# Altium PCB MainBoardPCB_PWR.PcbDoc (part 3 of 29)
Units mm, origin at the board's own origin, x right, y up, seen from the top; angles counter-clockwise.
Board outline 333.63 x 349.38 mm, 16 copper layers (L1, L2 (GND), L3 (Sign), L4 (GND), L5 (Sign), L6 (PWR/GND), L7(PWR/GND), L8 (PWR/GND), L9 (PWR/GND), L10 (PWR/GND), L11 (PWR/GND), L12 (Sign), L13 (GND), L14 (Sign), L15 (GND), L16), stack 2.503 mm thick; 2187 components, 1615 nets, 7987 pads, 1695 vias.
Unrouted connection lines stored in the file: 4757.
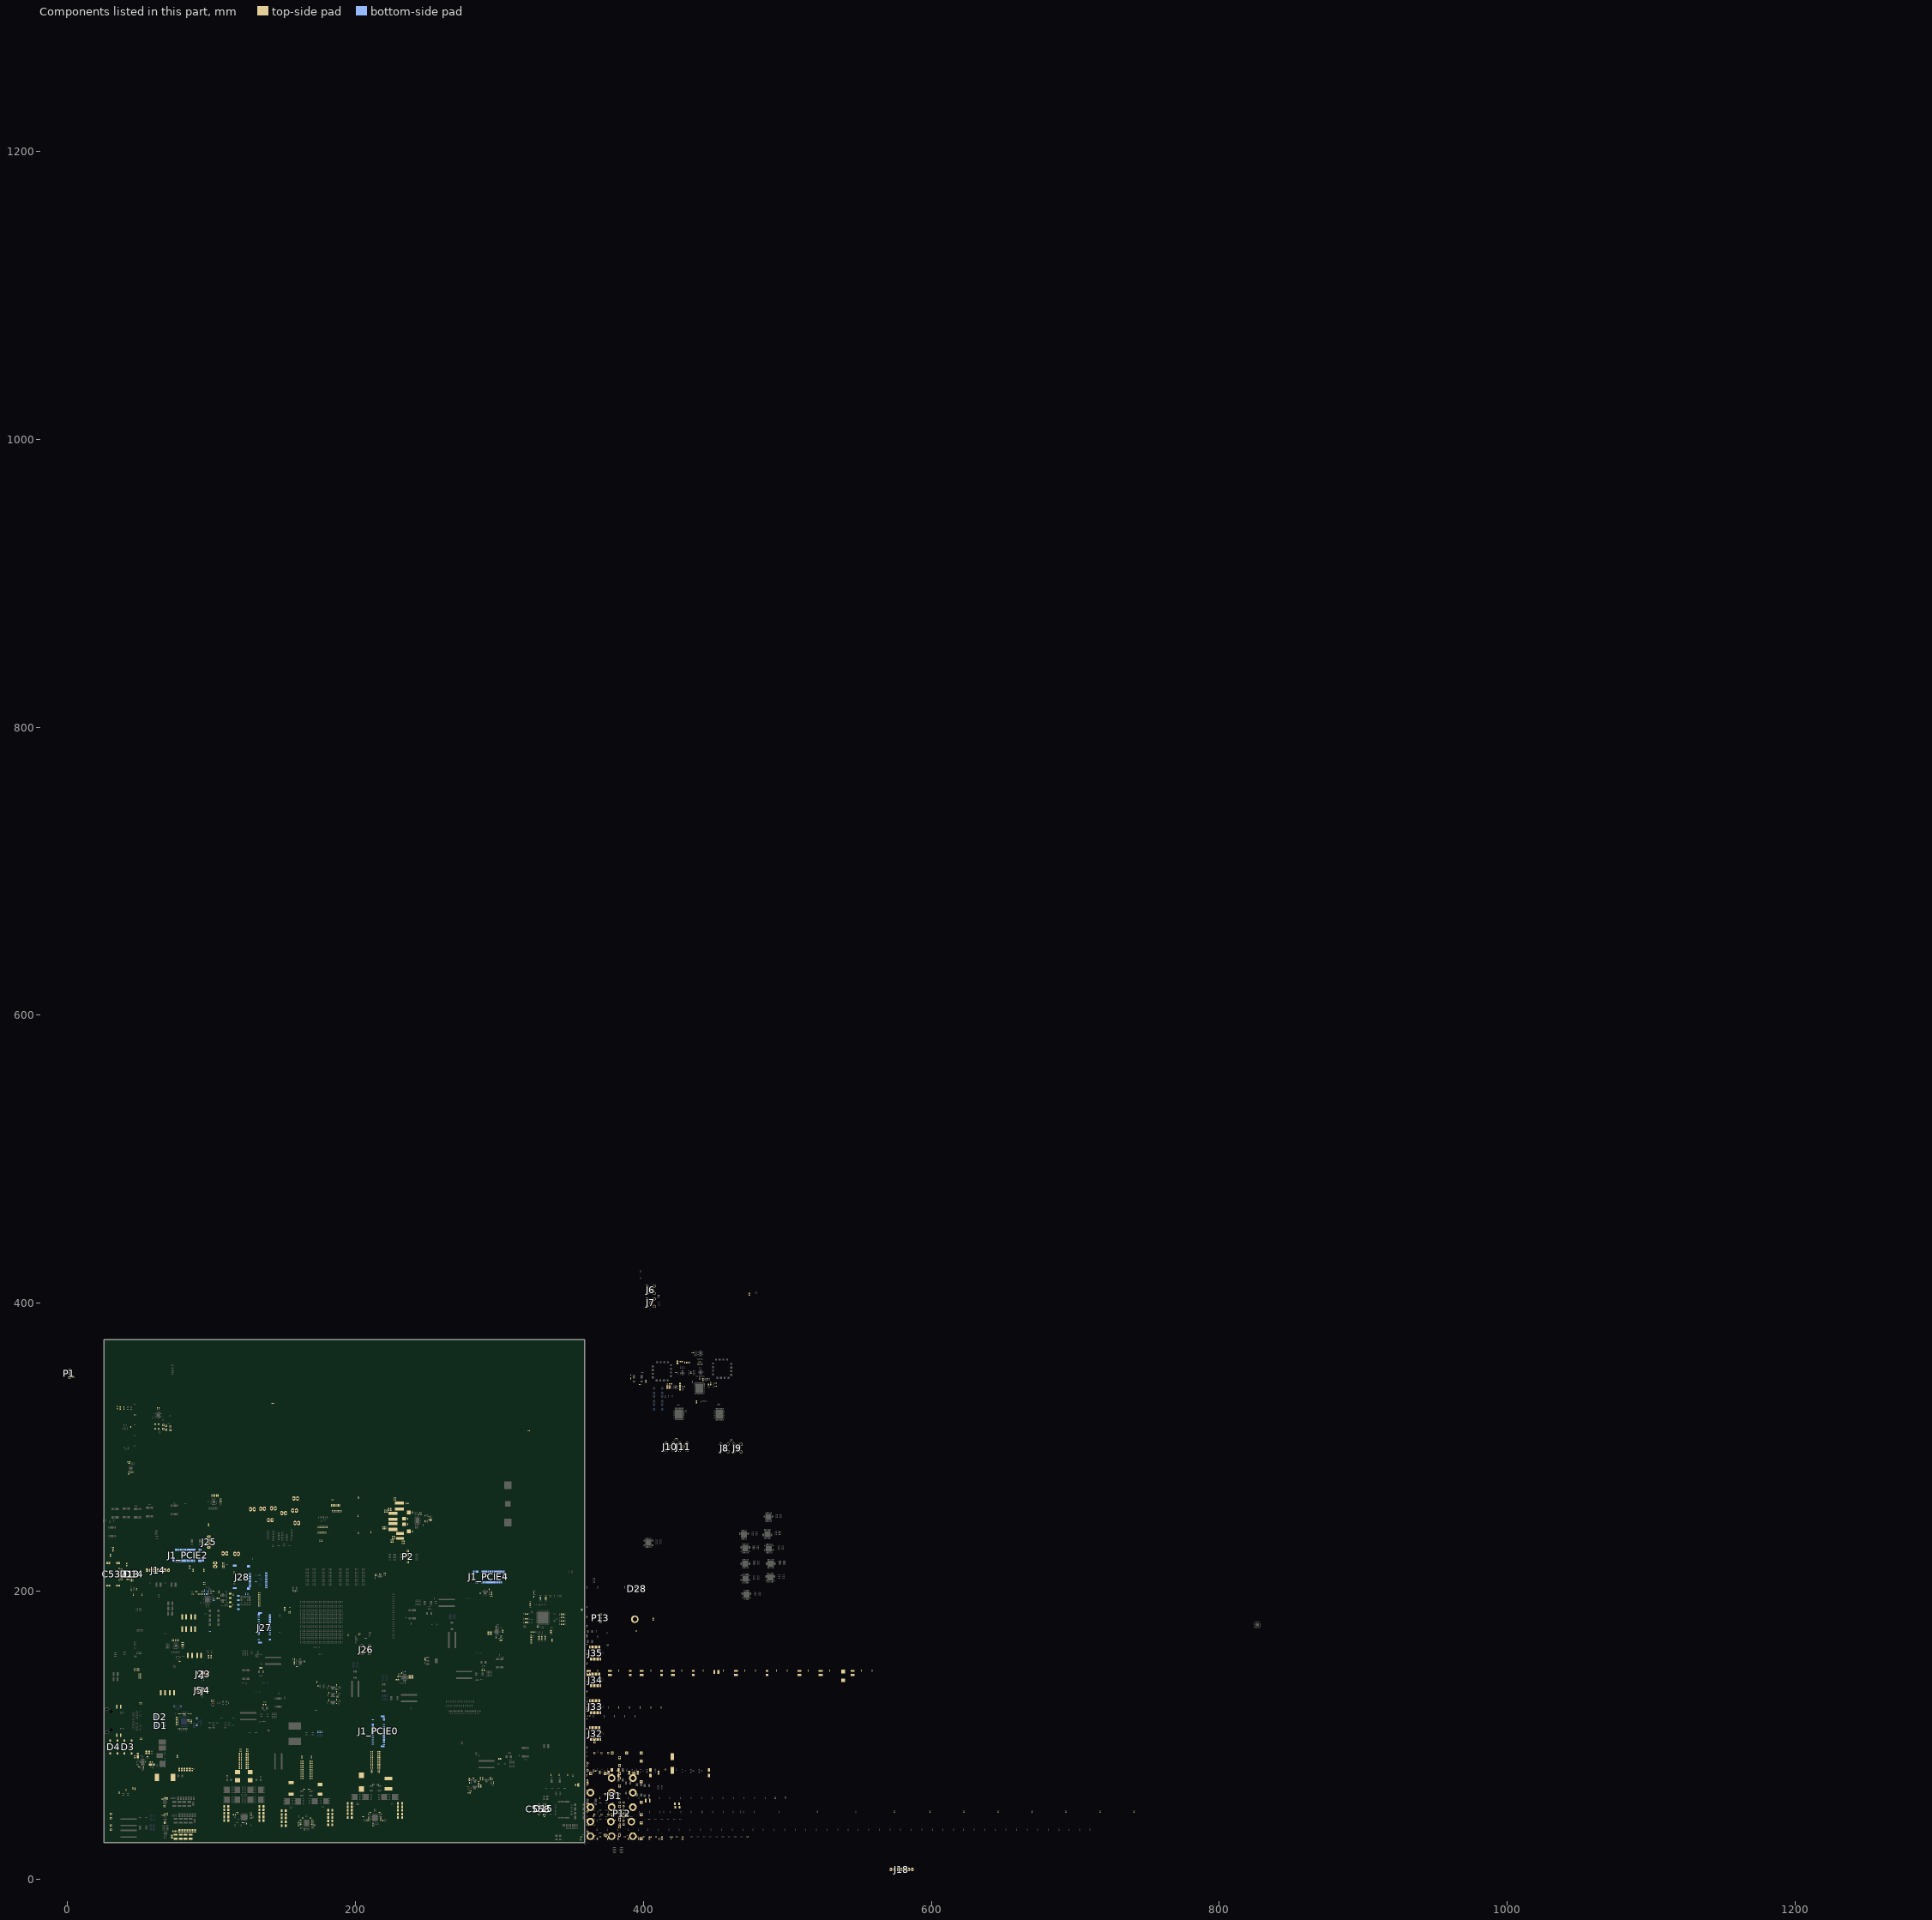
[diagram p10: the components of this part, seen from the top]

## Components (designator, comment, footprint, x,y, rotation, side; value= is the part's Value field where it differs from the comment) (continued)
C309_U_Pomiar_pradu_napiecia_2 "100nF" "CAP 0402/1005 RF" 360.832,130.327 r90 top (schematic designator C309)
C309_U_Pomiar_pradu_napiecia_3 "100nF" "CAP 0402/1005 RF" 360.832,136.804 r90 top (schematic designator C309)
C309_U_Pomiar_pradu_napiecia_4 "100nF" "CAP 0402/1005 RF" 360.832,143.281 r90 top (schematic designator C309)
C309_U_Pomiar_pradu_napiecia_5 "100nF" "CAP 0402/1005 RF" 360.832,149.758 r90 top (schematic designator C309)
C309_U_Pomiar_pradu_napiecia_6 "100nF" "CAP 0402/1005 RF" 360.832,156.235 r90 top (schematic designator C309)
C309_U_Pomiar_pradu_napiecia_7 "100nF" "CAP 0402/1005 RF" 360.832,162.712 r90 top (schematic designator C309)
C309_U_Pomiar_pradu_napiecia_8 "100nF" "CAP 0402/1005 RF" 360.832,169.189 r90 top (schematic designator C309)
C309_U_Pomiar_pradu_napiecia_9 "100nF" "CAP 0402/1005 RF" 360.832,175.666 r90 top (schematic designator C309)
C309_U_Pomiar_pradu_napiecia_10 "100nF" "CAP 0402/1005 RF" 360.832,182.143 r90 top (schematic designator C309)
C309_U_Pomiar_pradu_napiecia_11 "100nF" "CAP 0402/1005 RF" 360.832,188.62 r90 top (schematic designator C309)
C310 "100nF" "CAP 0402/1005 RF" 360.832,40.386 r90 top
C311_I2C_Expander1 "1uF" "CAP 0402/1005 RF" 360.832,52.603 r90 top (schematic designator C311)
C311_I2C_Expander2 "1uF" "CAP 0402/1005 RF" 360.832,59.08 r90 top (schematic designator C311)
C311_I2C_Expander3 "1uF" "CAP 0402/1005 RF" 360.832,65.557 r90 top (schematic designator C311)
C311_I2C_Expander? "1uF" "CAP 0402/1005 RF" 360.832,72.034 r90 top (schematic designator C311)
C311_I2C_Expander_10 "1uF" "CAP 0402/1005 RF" 360.832,78.511 r90 top (schematic designator C311)
C311_I2C_Expander_11 "1uF" "CAP 0402/1005 RF" 360.832,84.988 r90 top (schematic designator C311)
C311_I2C_Expander_12 "1uF" "CAP 0402/1005 RF" 360.832,91.465 r90 top (schematic designator C311)
C311_I2C_Expander_13 "1uF" "CAP 0402/1005 RF" 360.832,97.942 r90 top (schematic designator C311)
C311_I2C_Expander_14 "1uF" "CAP 0402/1005 RF" 360.832,104.419 r90 top (schematic designator C311)
C311_I2C_Expander_15 "1uF" "CAP 0402/1005 RF" 360.832,110.896 r90 top (schematic designator C311)
C311_I2C_Expander_16 "1uF" "CAP 0402/1005 RF" 360.832,117.373 r90 top (schematic designator C311)
C320 "10nF" "CAP 0402/1005 RF" 397.535,343.662 r180 top
C321 "3.3nF" "CAP 0603/1608 RF" 401.726,345.77 r90 top
C322 "27pF" "CAP 0402/1005 RF" 391.185,347.749 r90 top
C323 "27pF" "CAP 0402/1005 RF" 391.185,349.729 r270 top
C324 "10uF" "CAP 0805/2012 RF" 354.8,65.363 r90 top
C325 "100nF" "CAP 0402/1005 RF" 439.853,359.673 r270 top
C326 "1uF" "CAP 0402/1005 RF" 335.672,72.451 r90 top
C327 "1uF" "CAP 0402/1005 RF" 341.514,72.451 r90 top
C328 "1uF" "CAP 0402/1005 RF" 347.356,72.451 r90 top
C329 "1uF" "CAP 0402/1005 RF" 350.97,71.756 r90 top
C330 "100nF" "CAP 0402/1005 RF" 438.652,359.673 r270 top
C331 "1uF" "CAP 0402/1005 RF" 202.311,170.148 r270 top
C332 "1uF" "CAP 0402/1005 RF" 207.098,167.219 r0 top
C333 "10nF" "CAP 0201/0603 RF" 422.687,351.917 r180 top
C334 "100nF" "CAP 0402/1005 RF" 450.24,344.378 r180 top
C335 "100nF" "CAP 0402/1005 RF" 450.24,342.288 r180 top
C336 "100nF" "CAP 0402/1005 RF" 429.836,358.766 r90 top
C337 "100nF" "CAP 0402/1005 RF" 430.894,358.766 r90 top
C338 "100nF" "CAP 0402/1005 RF" 431.952,358.766 r90 top
C339 "10uF" "CAP 0805/2012 RF" 423.697,358.837 r90 top
C340 "1uF" "CAP 0402/1005 RF" 428.777,358.766 r90 top
C341 "100nF" "CAP 0402/1005 RF" 434.229,365.633 r0 top
C342 "100nF" "CAP 0402/1005 RF" 433.222,351.253 r0 top
C343 "100nF" "CAP 0402/1005 RF" 433.222,352.253 r0 top
C344 "10nF" "CAP 0201/0603 RF" 422.687,350.832 r180 top
C345 "22pF" "CAP 0402/1005 RF" 118.036,44.404 r0 top
C346 "100nF" "CAP 0402/1005 RF" 118.036,46.421 r180 top
C347 "10uF" "CAP 1206/3216" 110.249,48.133 r180 top
C348 "10uF" "CAP 1206/3216" 110.249,50.597 r180 top
C349 "22pF" "CAP 0402/1005 RF" 127.419,44.139 r180 top
C350 "100nF" "CAP 0402/1005 RF" 127.404,46.156 r0 top
C351 "1uF" "CAP 0402/1005 RF" 121.352,38.84 r90 top
C352 "10uF" "CAP 1206/3216" 134.685,48.088 r0 top
C353 "10uF" "CAP 1206/3216" 134.685,50.597 r0 top
C354 "4.7 µF" "CAP 0603/1608 RF" 220.396,243.898 r270 top
C355 "4.7 µF" "CAP 0603/1608 RF" 219.102,243.909 r270 top
C356 "1uF" "CAP 0402/1005 RF" 124.277,38.625 r90 top
C357 "100nF" "CAP 0402/1005 RF" 127.419,42.524 r180 top
C358 "1uF" "CAP 0603/1608 RF" 115.967,44.623 r0 top
C359 "100nF" "CAP 0402/1005 RF" 124.878,90.408 r0 top
C360 "470nF" "CAP 0402/1005 RF" 120.127,90.408 r180 top
C361 "1uF" "CAP 0402/1005 RF" 124.879,88.519 r0 top
C362 "4.7uF" "CAP 0603/1608 RF" 120.127,79.465 r180 top
C363 "10uF" "CAP 0603/1608 RF" 120.127,78.146 r180 top
C364 "22uF" "CAP 0603/1608 RF" 120.127,80.785 r180 top
C365 "10uF" "CAP 0603/1608 RF" 124.879,76.826 r0 top
C366 "22uF" "CAP 0603/1608 RF" 120.127,76.826 r180 top
C367 "10uF" "CAP 0603/1608 RF" 124.879,79.465 r0 top
C368 "22uF" "CAP 0603/1608 RF" 124.879,78.146 r0 top
C369 "10uF" "CAP 0603/1608 RF" 124.879,80.785 r0 top
C370 "22uF" "CAP 0603/1608 RF" 120.127,82.104 r180 top
C371 "10uF" "CAP 1206/3216 - 0.8MM" 134.685,43.216 r0 top
C372 "10uF" "CAP 1206/3216 - 0.8MM" 110.249,45.669 r180 top
C373 "10uF" "CAP 1206/3216 - 0.8MM" 110.249,40.767 r180 top
C374 "10uF" "CAP 1206/3216 - 0.8MM" 134.685,45.669 r0 top
C375 "10uF" "CAP 1206/3216 - 0.8MM" 110.249,43.216 r180 top
C376 "10uF" "CAP 1206/3216 - 0.8MM" 134.685,40.706 r0 top
C377 "100nF" "CAP 0402/1005 RF" 124.878,89.449 r0 top
C378 "470nF" "CAP 0402/1005 RF" 120.128,88.519 r180 top
C379 "1uF" "CAP 0402/1005 RF" 120.127,89.449 r180 top
C380 "4.7uF" "CAP 0603/1608 RF" 120.127,83.424 r180 top
C381 "10uF" "CAP 0603/1608 RF" 124.879,83.424 r0 top
C382 "22uF" "CAP 0603/1608 RF" 124.879,84.743 r0 top
C383 "10uF" "CAP 0603/1608 RF" 120.127,87.382 r180 top
C384 "22uF" "CAP 0603/1608 RF" 124.879,86.063 r0 top
C385 "10uF" "CAP 0603/1608 RF" 124.879,82.104 r0 top
C386 "22uF" "CAP 0603/1608 RF" 120.127,84.743 r180 top
C387 "10uF" "CAP 0603/1608 RF" 124.878,87.382 r0 top
C388 "22uF" "CAP 0603/1608 RF" 120.127,86.063 r180 top
C389 "22pF" "CAP 0402/1005 RF" 208.951,44.8 r270 top
C390 "100nF" "CAP 0402/1005 RF" 210.306,46.316 r180 top
C391 "10uF" "CAP 1206/3216" 196.063,50.291 r180 top
C392 "10uF" "CAP 1206/3216" 196.063,52.731 r0 top
C393 "22pF" "CAP 0402/1005 RF" 218.055,44.799 r270 top
C394 "100nF" "CAP 0402/1005 RF" 216.655,46.316 r0 top
C395 "1uF" "CAP 0402/1005 RF" 212.42,36.998 r0 top
C396 "10uF" "CAP 1206/3216" 231.006,50.198 r180 top
C397 "10uF" "CAP 1206/3216" 231.006,52.687 r0 top
C398 "1uF" "CAP 0402/1005 RF" 212.295,38.616 r90 top
C399 "100nF" "CAP 0402/1005 RF" 205.386,43.462 r180 top
C400 "10uF" "CAP 1206/3216 - 0.8MM" 231.007,42.723 r180 top
C401 "10uF" "CAP 1206/3216 - 0.8MM" 231.007,45.203 r180 top
C402 "10uF" "CAP 1206/3216 - 0.8MM" 231.007,47.72 r180 top
C403 "10uF" "CAP 1206/3216 - 0.8MM" 196.032,42.803 r0 top
C404 "10uF" "CAP 1206/3216 - 0.8MM" 196.063,45.323 r0 top
C405 "10uF" "CAP 1206/3216 - 0.8MM" 196.063,47.846 r0 top
C406 "100nF" "CAP 0402/1005 RF" 211.318,73.946 r180 top
C407 "470nF" "CAP 0402/1005 RF" 211.321,74.92 r180 top
C408 "1uF" "CAP 0402/1005 RF" 211.318,75.891 r180 top
C409 "4.7uF" "CAP 0603/1608 RF" 211.321,79.974 r180 top
C410 "10uF" "CAP 0603/1608 RF" 211.321,81.397 r180 top
C411 "22uF" "CAP 0603/1608 RF" 211.321,77.155 r180 top
C412 "10uF" "CAP 0603/1608 RF" 211.321,78.552 r180 top
C413 "22uF" "CAP 0603/1608 RF" 211.321,82.794 r180 top
C414 "10uF" "CAP 0603/1608 RF" 211.321,87.036 r180 top
C415 "22uF" "CAP 0603/1608 RF" 211.321,88.458 r180 top
C416 "10uF" "CAP 0603/1608 RF" 211.321,84.191 r180 top
C417 "22uF" "CAP 0603/1608 RF" 211.318,85.626 r180 top
C418 "100nF" "CAP 0402/1005 RF" 216.235,73.946 r0 top
C419 "470nF" "CAP 0402/1005 RF" 216.235,74.92 r0 top
C420 "1uF" "CAP 0402/1005 RF" 216.235,75.891 r0 top
C421 "4.7uF" "CAP 0603/1608 RF" 216.236,79.974 r0 top
C422 "10uF" "CAP 0603/1608 RF" 216.236,81.397 r0 top
C423 "22uF" "CAP 0603/1608 RF" 216.235,77.155 r0 top
C424 "10uF" "CAP 0603/1608 RF" 216.236,78.552 r0 top
C425 "22uF" "CAP 0603/1608 RF" 216.236,82.794 r0 top
C426 "10uF" "CAP 0603/1608 RF" 216.237,87.036 r0 top
C427 "22uF" "CAP 0603/1608 RF" 216.227,88.453 r0 top
C428 "10uF" "CAP 0603/1608 RF" 216.236,84.191 r0 top
C429 "22uF" "CAP 0603/1608 RF" 216.236,85.626 r0 top
C430 "22pF" "CAP 0402/1005 RF" 161.858,41.04 r0 top
C431 "100nF" "CAP 0402/1005 RF" 163.383,42.453 r90 top
C432 "10uF" "CAP 1206/3216" 150.151,44.958 r180 top
C433 "10uF" "CAP 1206/3216" 150.151,47.523 r0 top
C434 "22pF" "CAP 0402/1005 RF" 170.124,40.64 r180 top
C435 "100nF" "CAP 0402/1005 RF" 168.633,42.468 r90 top
C436 "1uF" "CAP 0402/1005 RF" 160.318,39.203 r270 top
C437 "10uF" "CAP 1206/3216" 182.534,45.266 r180 top
C438 "10uF" "CAP 1206/3216" 182.534,47.806 r0 top
C439 "1uF" "CAP 0402/1005 RF" 164.433,34.527 r90 top
C440 "100nF" "CAP 0402/1005 RF" 160.538,43.517 r90 top
C441 "10uF" "CAP 1206/3216 - 0.8MM" 182.534,37.765 r180 top
C442 "10uF" "CAP 1206/3216 - 0.8MM" 182.524,40.248 r180 top
C443 "10uF" "CAP 1206/3216 - 0.8MM" 182.534,42.726 r180 top
C444 "10uF" "CAP 1206/3216 - 0.8MM" 150.151,37.187 r0 top
C445 "10uF" "CAP 1206/3216 - 0.8MM" 150.151,39.767 r0 top
C446 "10uF" "CAP 1206/3216 - 0.8MM" 150.151,42.367 r0 top
C447 "100nF" "CAP 0402/1005 RF" 162.815,85.322 r180 top
C448 "470nF" "CAP 0402/1005 RF" 162.815,84.205 r180 top
C449 "1uF" "CAP 0402/1005 RF" 162.815,83.112 r180 top
C450 "4.7uF" "CAP 0603/1608 RF" 162.815,81.817 r180 top
C451 "10uF" "CAP 0603/1608 RF" 162.815,80.318 r180 top
C452 "22uF" "CAP 0603/1608 RF" 162.816,78.845 r180 top
C453 "10uF" "CAP 0603/1608 RF" 162.816,77.372 r180 top
C454 "22uF" "CAP 0603/1608 RF" 162.816,75.899 r180 top
C455 "10uF" "CAP 0603/1608 RF" 162.816,74.426 r180 top
C456 "22uF" "CAP 0603/1608 RF" 162.816,72.952 r180 top
C457 "10uF" "CAP 0603/1608 RF" 162.816,71.479 r180 top
C458 "22uF" "CAP 0603/1608 RF" 162.816,70.006 r180 top
C459 "100nF" "CAP 0402/1005 RF" 169.283,85.322 r0 top
C460 "470nF" "CAP 0402/1005 RF" 169.282,84.204 r0 top
C461 "1uF" "CAP 0402/1005 RF" 169.282,83.112 r0 top
C462 "4.7uF" "CAP 0603/1608 RF" 169.282,81.817 r0 top
C463 "10uF" "CAP 0603/1608 RF" 169.282,80.318 r0 top
C464 "22uF" "CAP 0603/1608 RF" 169.266,78.845 r0 top
C465 "10uF" "CAP 0603/1608 RF" 169.282,77.372 r0 top
C466 "22uF" "CAP 0603/1608 RF" 169.282,75.899 r0 top
C467 "10uF" "CAP 0603/1608 RF" 169.281,74.425 r0 top
C468 "22uF" "CAP 0603/1608 RF" 169.281,72.952 r0 top
C469 "10uF" "CAP 0603/1608 RF" 169.281,71.479 r0 top
C470 "22uF" "CAP 0603/1608 RF" 169.281,70.006 r0 top
C471 "100nF" "CAP 0402/1005 RF" 51.689,97.4 r90 top
C472 "100nF" "CAP 0402/1005 RF" 50.546,97.409 r90 top
C473 "100nF" "CAP 0402/1005 RF" 50.292,122.183 r270 top
C474 "100nF" "CAP 0402/1005 RF" 51.308,122.183 r270 top
C475 "Capacitor_1210" CAPC3326X17L 35.636,99.915 r180 top
C476 "Capacitor_1210" CAPC3326X17L 35.636,119.761 r180 top
C479 "100nF" "CAP 0402/1005 RF" 89.798,107.315 r180 bottom
C480 "27pF" "CAP 0402/1005 RF" 78.809,120.113 r270 bottom
C481 "27pF" "CAP 0402/1005 RF" 74.11,120.113 r90 bottom
C482 "100nF" "CAP 0402/1005 RF" 89.798,106.365 r180 bottom
C483 "100nF" "CAP 0402/1005 RF" 89.798,112.141 r180 bottom
C484 "100nF" "CAP 0402/1005 RF" 89.798,111.141 r180 bottom
C485 "1uF" "CAP 0402/1005 RF" 78.914,104.752 r90 top
C486 "1uF" "CAP 0402/1005 RF" 78.911,114.466 r270 top
C487 "100nF" "CAP 0402/1005 RF" 77.937,114.466 r270 top
C488 "100nF" "CAP 0402/1005 RF" 76.966,114.466 r270 top
C489 "10uF" "CAP 0402/1005 RF" 77.937,104.752 r90 top
C490 "10nF" "CAP 0402/1005 RF" 76.99,104.752 r90 top
C491 "1uF" "CAP 0402/1005 RF" 83.828,109.639 r0 top
C492 "1uF" "CAP 0402/1005 RF" 83.837,110.561 r0 top
C493 "1uF" "CAP 0402/1005 RF" 173.197,136.909 r90 top
C494 "100nF" "CAP 0402/1005 RF" 81.837,114.46 r270 top
C495 "100nF" "CAP 0402/1005 RF" 79.902,114.466 r270 top
C496 "100nF" "CAP 0402/1005 RF" 80.87,114.46 r270 top
C497 "10uF" "CAP 0402/1005 RF" 83.038,104.752 r90 top
C498 "10nF" "CAP 0402/1005 RF" 82.107,104.752 r90 top
C499 "1uF" "CAP 0402/1005 RF" 75.941,111.541 r0 top
C500 "1uF" "CAP 0402/1005 RF" 75.932,106.045 r0 top
C501 "100nF" "CAP 0402/1005 RF" 75.932,106.965 r0 top
C502 "100nF" "CAP 0402/1005 RF" 75.932,110.639 r0 top
C503 "10uF" "CAP 0402/1005 RF" 75.941,112.443 r0 top
C504 "10nF" "CAP 0402/1005 RF" 75.932,107.893 r0 top
C505 "1uF" "CAP 0402/1005 RF" 80.217,104.752 r90 top
C506 "1uF" "CAP 0402/1005 RF" 75.932,108.809 r0 top
C507 "1uF" "CAP 0402/1005 RF" 85.001,114.466 r270 top
C508 "1uF" "CAP 0402/1005 RF" 85.761,108.639 r180 top
C509 "100nF" "CAP 0402/1005 RF" 85.741,109.542 r180 top
C510 "100nF" "CAP 0402/1005 RF" 83.992,114.466 r270 top
C511 "100nF" "CAP 0402/1005 RF" 75.932,109.724 r0 top
C512 "100nF" "CAP 0402/1005 RF" 86.011,114.466 r270 top
C513 "10uF" "CAP 0402/1005 RF" 81.14,104.752 r90 top
C514 "10nF" "CAP 0402/1005 RF" 85.741,110.444 r180 top
C515 "4.7uF" "CAP 0603/1608 RF" 104.604,195.232 r0 top
C516 "4.7uF" "CAP 0603/1608 RF" 105.054,199.396 r270 top
C517 "100nF" "CAP 0402/1005 RF" 115.249,197.535 r90 top
C518 "2.2uF" "CAP 1206/3216 - 0.8MM" 118.72,195.199 r90 bottom
C519 "100nF" "CAP 0402/1005 RF" 114.989,190.479 r270 top
C520 "2.2uF" "CAP 1206/3216 - 0.8MM" 118.72,188.994 r90 bottom
C521 "100nF" "CAP 0402/1005 RF" 125.318,198.013 r270 bottom
C522 "1uF" "CAP 0402/1005 RF" 123.76,198.013 r270 bottom
C523 "4.7uF" "CAP 0603/1608 RF" 87.249,214.503 r90 top
C524 "4.7uF" "CAP 0603/1608 RF" 94.742,214.503 r90 top
C525 "10nF" "CAP 0402/1005 RF" 150.885,188.731 r180 top
C526 "10nF" "CAP 0402/1005 RF" 150.885,187.72 r180 top
C527 "10nF" "CAP 0402/1005 RF" 154.323,184.707 r180 top
C528 "10nF" "CAP 0402/1005 RF" 154.323,185.801 r180 top
C529 "10nF" "CAP 0402/1005 RF" 154.305,188.341 r270 top
C530 "10nF" "CAP 0402/1005 RF" 150.885,186.577 r180 top
C531 "100nF" "CAP 0402/1005 RF" 46.736,322.453 r180 top
C532 "100nF" "CAP 0402/1005 RF" 63.5,327.076 r90 top
C533 "100nF" "CAP 0402/1005 RF" 62.4,327.076 r90 top
C534 "100nF" "CAP 0402/1005 RF" 44,314.013 r270 top
C535 "22pF" "CAP 0402/1005 RF" 157.014,200.432 r180 top
C536 "22pF" "CAP 0402/1005 RF" 158.734,200.432 r0 top
C537 "WE-Communication Connectors 692121130100" 692121130100 35.121,203.883 r270 top
C538 "1uF" "CAP 0402/1005 RF" 45.547,207.532 r90 top
C539 "4.7uF" "CAP 0603/1608 RF" 44.348,207.532 r90 top
C540 "100nF" "CAP 0402/1005 RF" 31.669,230.378 r0 top
C541 "100nF" "CAP 0402/1005 RF" 31.796,229.489 r0 top
C542 "100nF" "CAP 0402/1005 RF" 31.796,228.6 r0 top
C543 "100nF" "CAP 0402/1005 RF" 31.796,227.711 r0 top
C544 "1uF" "CAP 0402/1005 RF" 133.341,211.033 r180 bottom
C545 "100nF" "CAP 0402/1005 RF" 357.251,187.579 r0 top
C546 "100nF" "CAP 0402/1005 RF" 357.251,186.69 r0 top
C547 "100nF" "CAP 0402/1005 RF" 130.946,206.629 r0 bottom
C548 "11pF" "CAP 0402/1005 RF" 161.859,38.015 r0 top
C549 "220pF" "CAP 0402/1005 RF" 160.268,37.4 r270 top
C550 "4.7uF" "CAP 0402/1005 RF" 181.639,133.844 r270 top
C551 "10uF" "CAP 0402/1005 RF" 186.791,134.644 r270 top
C552 "4.7uF" "CAP 0402/1005 RF" 181.639,129.204 r270 top
C553 "10uF" "CAP 0402/1005 RF" 186.869,129.833 r270 top
C554 "4.7uF" "CAP 0402/1005 RF" 181.639,124.215 r270 top
C555 "10uF" "CAP 0402/1005 RF" 186.854,124.45 r270 top
C558 "WR-Communication Connectors 614105150721" 614105150721 327.441,48.431 r90 bottom
C559 "1uF" "CAP 0402/1005 RF" 331.387,43.48 r0 top
C560 "4.7uF" "CAP 0603/1608 RF" 331.26,44.75 r0 top
C561 "100nF" "CAP 0402/1005 RF" 77.861,151.16 r0 top
C562 "100nF" "CAP 0402/1005 RF" 395.088,172.212 r0 top
C563_5V_to_3V3_for_FTDI "4.7uF" "CAP 0603/1608 RF" 42.745,282.16 r90 top (schematic designator C563)
C563_U_5V_to_3V31 "4.7uF" "CAP 0603/1608 RF" 406.908,180.457 r90 top (schematic designator C563)
C563_U_5V_to_3V32 "4.7uF" "CAP 0603/1608 RF" 287.029,64.684 r270 top (schematic designator C563)
C563_U_5V_to_3V33 "4.7uF" "CAP 0603/1608 RF" 286.906,69.606 r270 top (schematic designator C563)
C564_5V_to_3V3_for_FTDI "4.7uF" "CAP 0603/1608 RF" 44.82,282.785 r180 top (schematic designator C564)
C564_U_5V_to_3V31 "4.7uF" "CAP 0603/1608 RF" 285.672,67.109 r90 top (schematic designator C564)
C564_U_5V_to_3V32 "4.7uF" "CAP 0603/1608 RF" 285.654,64.684 r270 top (schematic designator C564)
C564_U_5V_to_3V33 "4.7uF" "CAP 0603/1608 RF" 288.308,69.606 r270 top (schematic designator C564)
C565_5V_to_3V3_for_FTDI "4.7uF" "CAP 0603/1608 RF" 42.52,289.909 r0 top (schematic designator C565)
C565_U_5V_to_3V31 "4.7uF" "CAP 0603/1608 RF" 279.018,69.134 r90 top (schematic designator C565)
C565_U_5V_to_3V32 "4.7uF" "CAP 0603/1608 RF" 278.954,59.976 r180 top (schematic designator C565)
C565_U_5V_to_3V33 "4.7uF" "CAP 0603/1608 RF" 293.804,69.606 r270 top (schematic designator C565)
C566_5V_to_3V3_for_FTDI "100nF" "CAP 0402/1005 RF" 42.745,287.706 r0 top (schematic designator C566)
C566_U_5V_to_3V31 "100nF" "CAP 0402/1005 RF" 279.242,66.899 r270 top (schematic designator C566)
C566_U_5V_to_3V32 "100nF" "CAP 0402/1005 RF" 280.366,61.582 r90 top (schematic designator C566)
C566_U_5V_to_3V33 "100nF" "CAP 0402/1005 RF" 295.76,67.053 r90 top (schematic designator C566)
C567_5V_to_3V3_for_FTDI "2.2uF" "CAP 0402/1005 RF" 42.772,288.686 r0 top (schematic designator C567)
C567_U_5V_to_3V31 "2.2uF" "CAP 0402/1005 RF" 281.861,70.159 r180 top (schematic designator C567)
C567_U_5V_to_3V32 "2.2uF" "CAP 0402/1005 RF" 279.451,61.582 r90 top (schematic designator C567)
C567_U_5V_to_3V33 "2.2uF" "CAP 0402/1005 RF" 294.937,69.521 r270 top (schematic designator C567)
C568 "4.7uF" "CAP 0402/1005 RF" 292.935,201.182 r270 top
C569 "4.7uF" "CAP 0402/1005 RF" 294.485,196.36 r0 top
C570 "4.7uF" "CAP 0402/1005 RF" 286.714,198.556 r90 top
C571 "1nF" "CAP 0201/0603 RF" 290.33,196.303 r180 top
C572 "10uF" "CAP 0603/1608 RF" 229.012,138.456 r0 top
C573 "10nF" "CAP 0201/0603 RF" 231.66,136.949 r180 top
C574 "10uF" "CAP 0805/2012 RF" 237.691,140.38 r270 top
C575 "10uF" "CAP 0805/2012 RF" 239.494,140.38 r270 top
C576 "10uF" "CAP 0603/1608 RF" 230.305,140.553 r0 top
C577 "10nF" "CAP 0201/0603 RF" 232.192,143.112 r270 top
C578 "100nF" "CAP 0402/1005 RF" 234.68,143.658 r270 top
C579 "100nF" "CAP 0402/1005 RF" 234.692,136.374 r90 top
C580 "4.7uF" "CAP 0805/2012 RF" 425.358,343.392 r270 top
C581 "10uF" "CAP 0805/2012 RF" 416.436,341.692 r90 top
C582 "4.7uF" "CAP 0805/2012 RF" 418.189,341.692 r90 top
C583 "100nF" "CAP 0402/1005 RF" 416.436,343.829 r0 top
C584 "4.7uF" "CAP 0805/2012 RF" 425.358,340.592 r90 top
C585 "100nF" "CAP 0402/1005 RF" 111.695,122.453 r90 top
C586 "2.2uF" "CAP 1206/3216 - 0.8MM" 113.084,196.76 r90 top
C587 "2.2uF" "CAP 1206/3216 - 0.8MM" 113.084,190.759 r270 top
C588 "100nF" "CAP 0402/1005 RF" 323.853,198.975 r270 top
C589 "100nF" "CAP 0402/1005 RF" 323.853,196.112 r270 top
C590 "100nF" "CAP 0402/1005 RF" 322.084,169.216 r0 top
C591 "10uF" "CAP 0402/1005 RF" 322.084,165.152 r0 top
C592 "100nF" "CAP 0402/1005 RF" 322.084,164.067 r0 top
C593 "100nF" "CAP 0402/1005 RF" 326.139,175.429 r90 top
C594 "100nF" "CAP 0402/1005 RF" 327.063,175.429 r90 top
C595 "10uF" "CAP 0805/2012 RF" 56.704,88.017 r270 top
C596 "10uF" "CAP 0805/2012 RF" 54.875,88.007 r270 top
C597 "1uF" "CAP 0402/1005 RF" 55.54,84.951 r180 top
C598 "10uF" "CAP 0603/1608 RF" 58.228,81.386 r180 top
C603 "43pF" "CAP 0201/0603 RF" 250.98,249.474 r270 top
C604 "1µF" "CAP 0402/1005 RF" 245.124,254.516 r180 top
C605 "100pF" "CAP 0201/0603 RF" 250.972,251.571 r90 top
C606 "4.7 µF" "CAP 0603/1608 RF" 220.471,255.655 r270 top
C607 "4.7 µF" "CAP 0603/1608 RF" 224.596,256.791 r270 top
C609 "FC0H224ZFTBR24" FC0H224ZFTBR24 420.04,80.314 r90 top
C610 "4.7 µF" "CAP 0603/1608 RF" 223.201,256.791 r270 top
C611 "4.7 µF" "CAP 0603/1608 RF" 221.799,255.655 r270 top
C612 "43pF" "CAP 0201/0603 RF" 248.17,252.624 r90 top
C613 "4.7 µF" "CAP 0603/1608 RF" 227.389,264.63 r0 top
C614 "4.7 µF" "CAP 0603/1608 RF" 235.772,260.761 r180 top
C615 "4.7 µF" "CAP 0603/1608 RF" 227.389,263.314 r0 top
C616 "100pF" "CAP 0201/0603 RF" 248.32,248.558 r270 top
C617 "4.7 µF" "CAP 0603/1608 RF" 225.383,235.476 r0 top
C618 "4.7 µF" "CAP 0603/1608 RF" 233.121,233.286 r180 top
C619 "4.7 µF" "CAP 0603/1608 RF" 225.875,237.479 r270 top
C620 "4.7 µF" "CAP 0603/1608 RF" 233.121,234.614 r180 top
C621 "4.7 µF" "CAP 0603/1608 RF" 227.265,237.479 r270 top
C622 "4.7 µF" "CAP 0603/1608 RF" 225.396,234.202 r0 top
C623 "100nF" "CAP 0402/1005 RF" 387.198,43.485 r0 top
C624 "10nF" "CAP 0201/0603 RF" 360.934,43.637 r0 top
C625 "10nF" "CAP 0201/0603 RF" 365.252,43.637 r0 top
C626 "10nF" "CAP 0201/0603 RF" 369.57,43.637 r0 top
C627 "100nF" "CAP 0201/0603 RF" 360.68,158.648 r90 top
C628 "470nF" "CAP 0402/1005 RF" 368.198,158.318 r90 top
C629 "100nF" "CAP 0201/0603 RF" 381.241,75.298 r0 top
C630 "470nF" "CAP 0402/1005 RF" 385.889,75.146 r0 top
C631 "10uF" "CAP 0603/1608 RF" 365.9,74.968 r0 top
C632 "470nF" "CAP 0402/1005 RF" 361.251,75.146 r0 top
C633 "3nF" "CAP 0402/1005 RF" 110.833,71.526 r270 top
C634 "330pF" "CAP 0402/1005 RF" 122.002,39.112 r0 bottom
C635 "6.8nF" "CAP 0402/1005 RF" 122.002,38.147 r0 bottom
C636 "3nF" "CAP 0402/1005 RF" 134.085,71.416 r270 top
C637 "1.2nF" "CAP 0402/1005 RF" 212.33,65.623 r180 top
C638 "1.2nF" "CAP 0402/1005 RF" 215.56,65.623 r0 top
C639 "47nF" "CAP 0402/1005 RF" 209.441,42.359 r0 top
C640 "47nF" "CAP 0402/1005 RF" 217.555,42.359 r180 top
C641 "470pF" "CAP 0402/1005 RF" 217.555,41.359 r180 top
C642 "56pF" "CAP 0402/1005 RF" 209.451,41.359 r0 top
C643 "8.2nF" "CAP 0402/1005 RF" 219.162,40.694 r270 top
C644 "820pF" "CAP 0402/1005 RF" 207.935,40.749 r270 top
C645 "1.2nF" "CAP 0402/1005 RF" 164.256,62.307 r180 top
C646 "1.2nF" "CAP 0402/1005 RF" 167.741,62.307 r0 top
C647 "47nF" "CAP 0402/1005 RF" 161.843,39.015 r0 top
C648 "47nF" "CAP 0402/1005 RF" 170.124,38.803 r180 top
C649 "100nF" "CAP 0402/1005 RF" 410.883,27.889 r90 top
C650 "180pF" "CAP 0402/1005 RF" 170.124,37.89 r180 top
C651 "100nF" "CAP 0402/1005 RF" 404.025,27.889 r90 top
C652 "2.2nF" "CAP 0402/1005 RF" 171.666,37.4 r270 top
C653 "100nF" "CAP 0402/1005 RF" 396.659,27.889 r90 top
C654 "100nF" "CAP 0402/1005 RF" 173.978,134.224 r90 top
C655 "5.6nF" "CAP 0402/1005 RF" 186.721,131.98 r270 top
C656 "5.6nF" "CAP 0402/1005 RF" 187.116,126.745 r270 top
C657 "5.6nF" "CAP 0402/1005 RF" 186.869,121.628 r270 top
C658 "100nF" "CAP 0402/1005 RF" 472.338,29.388 r0 top
C659 "4.7uF" "CAP 0603/1608 RF" 419.24,29.21 r0 top
C660 "100nF" "CAP 0402/1005 RF" 423.227,29.388 r0 top
C661 "4.7uF" "CAP 0603/1608 RF" 404.762,29.21 r0 top
C662 "100nF" "CAP 0402/1005 RF" 408.749,29.388 r0 top
C663 "27pF" "CAP 0402/1005 RF" 395.796,29.388 r0 top
C664 "27pF" "CAP 0402/1005 RF" 400.113,29.388 r0 top
C665 "100nF" "CAP 0402/1005 RF" 365.57,29.388 r0 top
C666 "100nF" "CAP 0402/1005 RF" 369.887,29.388 r0 top
C667 "100nF" "CAP 0402/1005 RF" 374.205,29.388 r0 top
C668 "100nF" "CAP 0402/1005 RF" 378.524,29.388 r0 top
C669 "100nF" "CAP 0402/1005 RF" 382.841,29.388 r0 top
C670 "100nF" "CAP 0402/1005 RF" 387.159,29.388 r0 top
C671 "100nF" "CAP 0402/1005 RF" 391.477,29.388 r0 top
C672 "Capacitor_1210" CAPC3326X17L 403.019,54.508 r0 top
C673 "100nF" "CAP 0402/1005 RF" 356.734,29.437 r0 top
C674 "4.7uF" "CAP 0402/1005 RF" 159.306,147.662 r180 top
C675 "4.7uF" "CAP 0402/1005 RF" 157.587,152.512 r270 top
C676 "4.7uF" "CAP 0402/1005 RF" 164.589,151.15 r270 top
C677 "100nF" "CAP 0402/1005 RF" 389.293,27.889 r90 top
C678 "100uF" "CAP 1206/3216" 423.621,49.86 r0 top
C679 "100uF" "CAP 1206/3216" 423.342,52.4 r0 top
C680 "1uF" "CAP 0402/1005 RF" 361.251,41.491 r0 top
C693 "470nF" "CAP 0402/1005 RF" 59.589,77.52 r90 top
C694 "4.7uF" "CAP 0603/1608 RF" 86.59,76.065 r270 top
C695 "10uF" "CAP 0805/2012 RF" 79.463,76.068 r270 top
C696 "10uF" "CAP 0805/2012 RF" 83.04,76.069 r270 top
C697 "10uF" "CAP 0805/2012 RF" 81.218,76.069 r270 top
C698 "10uF" "CAP 0805/2012 RF" 77.658,76.065 r270 top
C699 "10uF" "CAP 0805/2012 RF" 84.868,76.065 r270 top
C700 "1uF" "CAP 0402/1005 RF" 87.728,76.065 r270 top
C701 "12nF" "CAP 0402/1005 RF" 49.574,77.884 r180 top
C702 "36pF" "CAP 0402/1005 RF" 48.659,79.42 r0 top
C703 "15nF" "CAP 0402/1005 RF" 52.778,77.442 r90 top
C704 "1uF" "CAP 0603/1608 RF" 46.685,85.014 r90 top
C705 "10uF" "CAP 0603/1608 RF" 302.427,172.155 r90 top
C706 "10nF" "CAP 0201/0603 RF" 301.053,175.397 r0 top
C707 "10uF" "CAP 0805/2012 RF" 292.356,170.733 r90 top
C708 "10uF" "CAP 0805/2012 RF" 294.076,170.733 r90 top
C709 "10uF" "CAP 0603/1608 RF" 301.102,165.803 r180 top
C710 "10nF" "CAP 0201/0603 RF" 301.053,168.063 r180 top
C711 "100nF" "CAP 0402/1005 RF" 297.752,167.803 r90 top
C712 "100nF" "CAP 0402/1005 RF" 297.752,175.18 r270 top
C713 "100nF" "CAP 0402/1005 RF" 248.384,150.119 r270 top
C714 "330nF" "CAP 0603/1608 RF" 248.376,152.782 r90 top
C715 "100nF" "CAP 0402/1005 RF" 382.168,27.889 r90 top
C716 "100nF" "CAP 0402/1005 RF" 375.056,27.889 r90 top
C717 "100nF" "CAP 0402/1005 RF" 367.944,27.889 r90 top
C718 "100nF" "CAP 0402/1005 RF" 356.464,27.352 r90 top
C719 "1nF" "CAP 0201/0603 RF" 161.718,153.027 r180 top
C720 "1uF" "CAP 0402/1005 RF" 213.741,211.107 r270 top
C721 "1uF" "CAP 0402/1005 RF" 214.655,211.107 r270 top
C722 "1uF" "CAP 0402/1005 RF" 217.151,212.008 r0 top
C723 "1uF" "CAP 0402/1005 RF" 220.364,212.558 r180 top
C724 "10nF" "CAP 0201/0603 RF" 388.645,29.997 r90 top
C725 "10nF" "CAP 0201/0603 RF" 381.279,29.997 r90 top
C726 "10nF" "CAP 0201/0603 RF" 373.913,29.997 r90 top
C727 "10nF" "CAP 0201/0603 RF" 366.547,29.997 r90 top
C728 "100nF" "CAP 0402/1005 RF" 101.516,194.212 r180 bottom
C729 "100nF" "CAP 0402/1005 RF" 96.278,197.904 r270 bottom
C730 "100nF" "CAP 0402/1005 RF" 97.278,197.904 r270 bottom
C731 "2.2uF" "CAP 0402/1005 RF" 101.516,193.329 r180 bottom
C732 "100nF" "CAP 0402/1005 RF" 95.154,197.904 r270 bottom
C733 "1uF" "CAP 0402/1005 RF" 48.234,201.394 r270 top
C734 "1uF" "CAP 0402/1005 RF" 44.348,200.729 r90 top
C735 "100nF" "CAP 0402/1005 RF" 95.053,200.491 r270 bottom
C736 "9pF" "CAP 0201/0603 RF" 96.124,198.327 r0 top
C737 "9pF" "CAP 0201/0603 RF" 101.401,199.944 r180 top
C738 "6TPE680MI" "CAP POL 2917/7343" 538.734,141.097 r90 top
C739 "100uF" "CAP 1210/3225 - 1MM" 545.236,143.231 r90 top
C740 "4.7uF" "CAP 0402/1005 RF" 551.434,144.729 r90 top
C741 "4.7uF" "CAP 0402/1005 RF" 558.8,144.729 r90 top
C742 "100uF" "CAP 1210/3225 - 1MM" 523.113,143.231 r90 top
C743 "4.7uF" "CAP 0402/1005 RF" 529.311,144.729 r90 top
C744 "47uF" "CAP 1206/3216 - 0.8MM" 485.775,143.231 r90 top
C745 "4.7uF" "CAP 0402/1005 RF" 492.455,144.729 r90 top
C746 "4.7uF" "CAP 0402/1005 RF" 499.821,144.729 r90 top
C747 "100uF" "CAP 1210/3225 - 1MM" 508.381,143.231 r90 top
C748 "4.7uF" "CAP 0402/1005 RF" 514.579,144.729 r90 top
C749 "47uF" "CAP 1206/3216 - 0.8MM" 434.721,143.231 r90 top
C750 "4.7uF" "CAP 0402/1005 RF" 441.401,144.729 r90 top
C751 "100uF" "CAP 1210/3225 - 1MM" 450.698,143.993 r0 top
C752 "4.7uF" "CAP 0402/1005 RF" 455.625,144.729 r90 top
C753 "100uF" "CAP 1210/3225 - 1MM" 464.16,143.231 r90 top
C754 "4.7uF" "CAP 0402/1005 RF" 470.357,144.729 r90 top
C755 "4.7uF" "CAP 0402/1005 RF" 477.723,144.729 r90 top
C756 "47uF" "CAP 1206/3216 - 0.8MM" 412.598,143.231 r90 top
C757 "100uF" "CAP 1210/3225 - 1MM" 420.472,143.231 r90 top
C758 "4.7uF" "CAP 0402/1005 RF" 426.669,144.729 r90 top
C759 "47uF" "CAP 1206/3216 - 0.8MM" 391.008,143.231 r90 top
C760 "100uF" "CAP 1210/3225 - 1MM" 398.856,143.231 r90 top
C761 "4.7uF" "CAP 0402/1005 RF" 405.054,144.729 r90 top
C762 "100uF" "CAP 1210/3225 - 1MM" 362.001,143.231 r90 top
C763 "4.7uF" "CAP 0402/1005 RF" 368.224,144.729 r90 top
C764 "100uF" "CAP 1210/3225 - 1MM" 376.758,143.231 r90 top
C765 "4.7uF" "CAP 0402/1005 RF" 382.956,144.729 r90 top
C766 "22uF" "CAP 1210/3225 - 1MM" 85.519,29.46 r270 top
C767 "22uF" "CAP 1210/3225 - 1MM" 82.051,29.46 r270 top
C768 "22uF" "CAP 1210/3225 - 1MM" 78.611,29.46 r270 top
C769 "22uF" "CAP 1210/3225 - 1MM" 75.207,29.46 r270 top
C770 "100nF" "CAP 0402/1005 RF" 75.872,33.255 r270 top
C771 "100nF" "CAP 0402/1005 RF" 74.865,33.255 r270 top
C772 "100nF" "CAP 0402/1005 RF" 73.958,33.255 r270 top
C773 "100nF" "CAP 0402/1005 RF" 73.027,33.255 r270 top
C774 "10uF" "CAP 0805/2012 RF" 88.682,33.471 r270 top
C775 "10uF" "CAP 0805/2012 RF" 86.869,33.471 r270 top
C776 "10uF" "CAP 0805/2012 RF" 85.046,33.471 r270 top
C777 "10uF" "CAP 0805/2012 RF" 83.301,33.47 r270 top
C778 "4.7uF" "CAP 0805/2012 RF" 81.487,33.471 r270 top
C779 "4.7uF" "CAP 0805/2012 RF" 79.678,33.471 r270 top
C780 "4.7uF" "CAP 0805/2012 RF" 77.783,33.471 r270 top
C781 "4.7uF" "CAP 0805/2012 RF" 72.627,29.501 r90 top
C782 "4.7uF" "CAP 0402/1005 RF" 405.054,119.177 r90 top
C783 "100nF" "CAP 0402/1005 RF" 412.42,119.177 r90 top
C784 "4.7uF" "CAP 0402/1005 RF" 390.322,119.177 r90 top
C785 "100nF" "CAP 0402/1005 RF" 397.688,119.177 r90 top
C786 "4.7uF" "CAP 0402/1005 RF" 375.564,119.177 r90 top
C787 "100nF" "CAP 0402/1005 RF" 382.93,119.177 r90 top
C788 "4.7uF" "CAP 0402/1005 RF" 360.832,119.177 r90 top
C789 "100nF" "CAP 0402/1005 RF" 368.198,119.177 r90 top
C790 "100nF" "CAP 0402/1005 RF" 415.29,76.149 r90 top
C791 "100nF" "CAP 0402/1005 RF" 491.49,56.363 r90 top
C792 "100nF" "CAP 0402/1005 RF" 369.621,56.363 r90 top
D1 "SLVU2.8-4BTG TVS Array" SLVU2.8-4 64.516,106.68 r0 bottom
D2 "SLVU2.8-4BTG TVS Array" SLVU2.8-4 64.389,112.649 r0 bottom
D3 "DF01S2" "DF005S2 - DF10S2" 41.986,91.694 r90 top
D4 "DF01S2" "DF005S2 - DF10S2" 32.233,91.694 r90 top
D5 "LTST-C190GKT" "LED 0603/1608 GREEN" 36.761,327.152 r90 top
D6 "LTST-C190GKT" "LED 0603/1608 GREEN" 34.729,327.406 r90 top
D7 "LTST-C190GKT" "LED 0603/1608 GREEN" 39.159,327.152 r90 top
D8 "LTST-C190GKT" "LED 0603/1608 GREEN" 44.254,327.025 r90 top
D9 "LTST-C190GKT" "LED 0603/1608 GREEN" 41.841,327.025 r270 top
D10 "LTST-C190GKT" "LED 0603/1608 GREEN" 361.899,113.386 r0 top
D11 "BAT54T1G" BAT54T1G 63.275,314.483 r90 top
D12 "BAT54T1G" BAT54T1G 60.856,314.483 r90 top
D13 "TPD2EUSB30DRTR" TPD2EUSB30 43.587,211.733 r0 top
D14 "TPD4EUSB30DQAR" TPD4EUSB30 46.096,211.733 r0 top
D15 "TPD2EUSB30DRTR" TPD2EUSB30 330.505,48.909 r0 top
D16 "MBRM140T3" "CASE 457" 235.57,246.422 r0 top
D17 "MBRM140T3" "CASE 457" 235.57,250.308 r0 top
D18 "MBRM140T3" "CASE 457" 238.87,254.678 r0 top
D19 "MBRM140T3" "CASE 457" 238.87,241.471 r0 top
D20 "S1M-13-F" S1M-13-F 445.567,73.889 r90 top
D21 "S1M-13-F" S1M-13-F 404.787,73.889 r90 top
D22 "S1M-13-F" S1M-13-F 382.676,73.889 r90 top
D23 "S1M-13-F" S1M-13-F 378.13,73.889 r90 top
D26 "DFLS1100-7" DFLS1100 59.128,79.555 r180 top
D27 "DFLS1100-7" DFLS1100 48.733,86.491 r270 top
D28 "BAS40-04-TP" BAS40-04-TP 395.376,201.625 r0 top
FB1_PCIE0 "Ferrite Chip" "FER 0603/1608" 97.917,246.039 r90 top (schematic designator FB1)
FB1_PCIE1 "Ferrite Chip" "FER 0603/1608" 288.671,145.119 r180 top (schematic designator FB1)
FB1_PCIE2 "Ferrite Chip" "FER 0603/1608" 134.376,146.732 r0 top (schematic designator FB1)
FB1_PCIE3 "Ferrite Chip" "FER 0603/1608" 136.906,121.158 r180 top (schematic designator FB1)
FB1_PCIE4 "Ferrite Chip" "FER 0603/1608" 300.177,83.566 r180 top (schematic designator FB1)
FB2 "220Ohm" "FER 0603/1608" 98.044,154.496 r90 top
FB3 "220Ohm" "FER 0603/1608" 441.418,347.004 r270 top
FB4 "220Ohm" "FER 0603/1608" 99.822,154.496 r90 top
FB5 "220Ohm" "FER 0603/1608" 436.868,331.523 r90 top
FB6 "220Ohm" "FER 0603/1608" 446.056,343.592 r180 top
FB7 "220Ohm" "FER 0603/1608" 473.511,406.18 r90 top
FB8 "220R" "FER 0603/1608" 323.363,171.471 r0 top
FB9 "220R" "FER 0603/1608" 343.792,183.939 r180 top
FB10 "220R" "FER 0603/1608" 335.8,171.843 r90 top
FB11 "220R" "FER 0603/1608" 318.755,184.158 r0 top
FB12 "220R" "FER 0603/1608" 331.727,167.474 r90 top
FB13 "220R" "FER 0603/1608" 321.44,190.813 r270 top
FB14 "220R" "FER 0603/1608" 327.453,167.474 r90 top
FB15 "220R" "FER 0603/1608" 332.235,195.073 r270 top
FB16 "220R" "FER 0603/1608" 343.792,179.264 r180 top
FB17 "220R" "FER 0603/1608" 328.453,195.073 r270 top
FB18 "220R" "FER 0603/1608" 343.792,181.611 r180 top
FB19 "220R" "FER 0603/1608" 343.792,176.912 r180 top
FB20 "220R" "FER 0603/1608" 318.733,180.764 r0 top
FB21 "220R" "FER 0603/1608" 329.453,167.474 r90 top
FB22 "220R" "FER 0603/1608" 318.733,178.264 r0 top
FB23 "Ferrite Chip" "FER 0603/1608" 353.704,65.372 r0 top
FB24 "Ferrite Chip" "FER 0603/1608" 426.404,359.537 r0 top
FB25 "Ferrite Chip" "FER 0603/1608" 84.963,216.662 r270 top
FB26 "220R" "FER 0603/1608" 42.011,208.157 r180 top
FB27 "220R" "FER 0603/1608" 41.059,218.483 r270 top
FB28 "220R" "FER 0603/1608" 29.891,224.808 r90 top
FB29 "220R" "FER 0603/1608" 76.251,85.166 r90 top
FB31 "220R" "FER 0603/1608" 331.26,46.401 r180 top
FB32 "220R" "FER 0603/1608" 331.267,51.901 r180 top
FB33 "120R" "FER 0603/1608" 294.485,198.46 r270 top
FB34 "330R" "FER 0603/1608" 418.907,343.927 r180 top
FB35 "220Ohm" "FER 0603/1608" 361.086,68.047 r90 top
FB36 "220R" "FER 0603/1608" 336.58,165.917 r270 top
FB37 "220R" "FER 0603/1608" 322.084,167.184 r270 top
FB38 "600R" "FER 0805/2012" 410.553,73.901 r90 top
FB39 "600R" "FER 0805/2012" 396.075,73.901 r90 top
FB40 "600R" "FER 0805/2012" 390.233,73.901 r90 top
FB41 "600R" "FER 0805/2012" 375.755,73.901 r90 top
FB42 "120R" "FER 0603/1608" 369.71,74.181 r90 top
FB43 "220R" "FER 0603/1608" 427.368,28.423 r90 top
FB44 "220R" "FER 0603/1608" 412.89,28.423 r90 top
FB45 "120R" "FER 0603/1608" 157.587,150.162 r90 top
J1_PCIE0 "Key M" "M.2 KEY M" 215.866,102.658 r90 bottom (schematic designator J1)
J1_PCIE2 "Key M" "M.2 KEY M" 83.795,224.954 r0 bottom (schematic designator J1)
J1_PCIE4 "Key M" "M.2 KEY M" 292.557,209.821 r180 bottom (schematic designator J1)
J2 "1909763-1" TECO-1909763-1_V 91.773,143.213 r0 top
J3 "1909763-1" TECO-1909763-1_V 96.348,143.213 r0 top
J4 "1909763-1" TECO-1909763-1_V 95.987,131.884 r0 top
J5 "1909763-1" TECO-1909763-1_V 90.932,131.884 r0 top
J6 "5-1814832-1" TECO-5-1814832-1_V 405.058,409.321 r90 bottom
J7 "5-1814832-1" TECO-5-1814832-1_V 405.058,400.304 r90 bottom
J8 "5-1814832-1" TECO-5-1814832-1_V 456.26,299.39 r180 bottom
J9 "5-1814832-1" TECO-5-1814832-1_V 465.277,299.39 r180 bottom
J10 "5-1814832-1" TECO-5-1814832-1_V 418.313,300.236 r180 bottom
J11 "5-1814832-1" TECO-5-1814832-1_V 427.711,300.236 r180 bottom
J12 "I2C_0Master" "MOLEX KK 0022272021" 158.496,264.414 r0 top
J13 "I2C1_Master" "MOLEX KK 0022272021" 102.532,218.313 r270 top
J14 "7 Pin" "JST XH B7B-XH-A" 62.731,214.528 r180 bottom
J15 "GPIO0_12" "MOLEX KK 0022272021" 159.258,247.269 r0 top
J16 "GPIO0_23" "MOLEX KK 0022272021" 140.843,249.301 r0 top
J17 "GPIO1_38" "MOLEX KK 0022272021" 128.397,256.921 r0 top
J18 "7 Pin" "JST XH B7B-XH-A" 579.356,6.706 r0 bottom
J19 "GPIO2_66" "MOLEX KK 0022272021" 135.509,257.302 r0 top
J20 "GPIO2_70" "MOLEX KK 0022272021" 143.002,257.556 r0 top
J21 "GPIO2_72" "MOLEX KK 0022272021" 150.114,254.254 r0 top
J22 "GPIO2_73" "MOLEX KK 0022272021" 157.734,255.905 r0 top
J23 "GPIO2_74" "MOLEX KK 0022272021" 117.475,225.933 r0 top
J24 "GPIO2_75" "MOLEX KK 0022272021" 109.347,226.187 r0 top
J25 "SPI1" "JST XH B4B-XH-A" 98.171,234.188 r90 top
J26 "5-1814832-1" TECO-5-1814832-1_V 207.234,159.385 r90 bottom
J27 "Key M-SATA CHINA" "M.2 KEY M - NVMe" 136.776,174.6 r270 bottom
J28 "693071020811" 693071020811 118.999,209.931 r90 bottom
J31 "SFP Connector" 2007132 393.421,30.556 r90 top
J32 "1703820001" 1703820001 361.671,101.067 r0 top
J33 "1703820001" 1703820001 361.671,119.71 r0 top
J34 "1703820001" 1703820001 361.671,138.354 r0 top
J35 "1703820001" 1703820001 361.671,156.997 r0 top
L1 "NRS4018T4R7MDGJV" NRS8040 72.523,129.469 r0 top
L2 "NRS4018T4R7MDGJV" NRS8040 66.249,129.469 r0 top
L3 "NRS4018T4R7MDGJV" NRS8040 91.376,155.385 r0 top
L4 "NRS4018T4R7MDGJV" NRS8040 85.103,155.385 r0 top
L5 "NRS4018T4R7MDGJV" NRS8040 87.298,173.643 r0 top
L6 "NRS4018T4R7MDGJV" NRS8040 81.024,173.643 r0 top
L7 "NRS4018T4R7MDGJV" NRS8040 87.298,182.165 r0 top
L8 "NRS4018T4R7MDGJV" NRS8040 81.024,182.165 r0 top
L9 "MGV0605R22M-10" MGV0605 118.066,71.501 r90 top
L10 "MGV0605R22M-10" MGV0605 126.914,71.526 r90 top
L11 "MGV10041R2M-10" "MGV1004 Series" 204.133,67.314 r90 top
L12 "744373560068" 744373560068 222.802,66.258 r90 top
L13 "CDRH5D28-8R2" CDRH5D28 225.965,244.934 r270 top
L15 "Inductance" FB0603 244.749,253.225 r0 top
L16 "CDRH5D28-4R2" CDRH5D28 225.965,251.976 r90 top
L17 "CDRH5D28-8R2" CDRH5D28 230.607,259.08 r90 top
L18 "CDRH4D28NP-3R3NC" CDRH4D28NP 230.914,238.351 r270 top
L19 "3.3uH, 13.8A" WE-CHSA_1011 155.203,63.097 r90 top
L20 "1.5 uH, 16.5 A" WE-HCC_8070 175.434,62.307 r90 top
L22 "SRP1265A-220M" SRP1265A-220M 67.695,70.552 r0 top
MP1_PCIE0 "M2x2.5mm" 9774025243 363.195,29.82 r90 top (schematic designator MP1)
MP1_PCIE1 "M2x2.5mm" 9774025243 363.195,39.903 r90 top (schematic designator MP1)
MP1_PCIE2 "M2x2.5mm" 9774025243 363.195,49.987 r90 top (schematic designator MP1)
MP1_PCIE3 "M2x2.5mm" 9774025243 363.195,60.071 r90 top (schematic designator MP1)
MP1_PCIE4 "M2x2.5mm" 9774025243 394.056,180.504 r90 top (schematic designator MP1)
MP2_PCIE0 "M2x2.5mm" 9774025243 377.927,29.82 r90 top (schematic designator MP2)
MP2_PCIE1 "M2x2.5mm" 9774025243 377.419,39.903 r90 top (schematic designator MP2)
MP2_PCIE2 "M2x2.5mm" 9774025243 377.927,49.987 r90 top (schematic designator MP2)
MP2_PCIE3 "M2x2.5mm" 9774025243 377.927,60.071 r90 top (schematic designator MP2)
MP2_PCIE4 "M2x2.5mm" 9774025243 377.927,70.155 r90 top (schematic designator MP2)
MP3_PCIE0 "M2x2.5mm" 9774025243 392.659,29.82 r90 top (schematic designator MP3)
MP3_PCIE1 "M2x2.5mm" 9774025243 391.643,39.903 r90 top (schematic designator MP3)
MP3_PCIE2 "M2x2.5mm" 9774025243 392.659,49.987 r90 top (schematic designator MP3)
MP3_PCIE3 "M2x2.5mm" 9774025243 392.659,60.071 r90 top (schematic designator MP3)
MP3_PCIE4 "M2x2.5mm" 9774025243 392.659,70.155 r90 top (schematic designator MP3)
P1 "Header 3" HDR1X3 1.37,348.539 r90 top
P2 "Header 4" HDR1X4 236.601,227.711 r270 top
P3 "Header 2" HDR1X2 66.571,312.852 r90 top
P4 "Header 2" HDR1X2 68.476,312.217 r90 top
P5 "Header 2" HDR1X2 71.397,311.836 r90 top
P6 "640456-2" TECO-640456-2_V 100.94,122.453 r90 top
P7 "Plug" PIN1#1 30.201,37.338 r90 top
P8 "Plug" PIN1#2 30.201,34.188 r90 top
P9 "Plug" PIN1#3 30.16,45.116 r90 top
P10 "Plug" PIN1#2 30.16,42.222 r90 top
P11 "Header 2" HDR1X2 366.014,95.047 r90 top
P12 "Header 7X2" HDR2X7 386.207,37.948 r90 top
P13 "Header 3" HDR1X3 370.332,178.714 r90 top
R1 "0R" "RES 0402/1005 RF" 379.959,41.046 r0 top
R2 "0R" "RES 0402/1005 RF" 375.641,41.046 r0 top
R3_I2C_Bridge "1kR" "RES 0402/1005 RF" 100.35,266.377 r90 top (schematic designator R3)
R3_I2C_Bridge_2 "1kR" "RES 0402/1005 RF" 740.816,46.787 r90 top (schematic designator R3)
R3_I2C_Bridge_3 "1kR" "RES 0402/1005 RF" 72.782,165.875 r90 top (schematic designator R3)
R4_I2C_Bridge "1kR" "RES 0402/1005 RF" 101.35,266.377 r90 top (schematic designator R4)
R4_I2C_Bridge_2 "1kR" "RES 0402/1005 RF" 717.194,46.787 r90 top (schematic designator R4)
R4_I2C_Bridge_3 "1kR" "RES 0402/1005 RF" 73.859,165.875 r90 top (schematic designator R4)
R5_I2C_Bridge "1kR" "RES 0402/1005 RF" 102.425,266.377 r90 top (schematic designator R5)
R5_I2C_Bridge_2 "1kR" "RES 0402/1005 RF" 693.572,46.787 r90 top (schematic designator R5)
R5_I2C_Bridge_3 "1kR" "RES 0402/1005 RF" 74.937,165.875 r90 top (schematic designator R5)
R6_I2C_Bridge "1kR" "RES 0402/1005 RF" 103.485,266.377 r90 top (schematic designator R6)
R6_I2C_Bridge_2 "1kR" "RES 0402/1005 RF" 669.95,46.787 r90 top (schematic designator R6)
R6_I2C_Bridge_3 "1kR" "RES 0402/1005 RF" 76.014,165.875 r90 top (schematic designator R6)
R7_I2C_Bridge "1kR" "RES 0402/1005 RF" 104.558,266.377 r90 top (schematic designator R7)
R7_I2C_Bridge_2 "1kR" "RES 0402/1005 RF" 646.328,46.787 r90 top (schematic designator R7)
R7_I2C_Bridge_3 "1kR" "RES 0402/1005 RF" 77.092,165.875 r90 top (schematic designator R7)
R8_I2C_Bridge "1kR" "RES 0402/1005 RF" 106.426,264.033 r0 top (schematic designator R8)
R8_I2C_Bridge_2 "1kR" "RES 0402/1005 RF" 622.706,46.787 r90 top (schematic designator R8)
R8_I2C_Bridge_3 "1kR" "RES 0402/1005 RF" 79.952,164.169 r0 top (schematic designator R8)
R9_I2C_Bridge "1kR" "RES 0402/1005 RF" 106.426,262.978 r0 top (schematic designator R9)
R9_I2C_Bridge_2 "1kR" "RES 0402/1005 RF" 599.11,46.787 r90 top (schematic designator R9)
R9_I2C_Bridge_3 "1kR" "RES 0402/1005 RF" 79.952,163.195 r0 top (schematic designator R9)
R10_I2C_Bridge "1kR" "RES 0402/1005 RF" 106.426,261.922 r0 top (schematic designator R10)
R10_I2C_Bridge_2 "1kR" "RES 0402/1005 RF" 574.218,46.787 r90 top (schematic designator R10)
R10_I2C_Bridge_3 "1kR" "RES 0402/1005 RF" 79.952,162.221 r0 top (schematic designator R10)
R11 "10kR" "RES 0402/1005 RF" 67.052,39.15 r90 top
R12 "95.3kR" "RES 0402/1005 RF" 65.999,55.624 r180 top
R13 "10kR" "RES 0402/1005 RF" 66.879,50.661 r90 top
R14 "0mR" "RES 0402/1005 RF" 175.712,102.141 r90 bottom
R15 "95.3kR" "RES 0402/1005 RF" 66.181,44.35 r180 top
R16 "0mR" "RES 0402/1005 RF" 176.728,102.141 r90 bottom
R17 "95.3kR" "RES 0402/1005 RF" 69.193,44.693 r0 top
R18 "24.9kR" "RES 0402/1005 RF" 67.96,39.15 r90 top
R19 "4.87kR" "RES 0402/1005 RF" 67.512,56.124 r270 top
R20 "95.3kR" "RES 0402/1005 RF" 69.012,55.595 r0 top
R21 "24.9kR" "RES 0402/1005 RF" 67.854,50.661 r90 top
R22 "0mR" "RES 0402/1005 RF" 174.687,102.141 r90 bottom
R23 "4.87kR" "RES 0402/1005 RF" 67.56,44.843 r270 top
R24 "0mR" "RES 0402/1005 RF" 173.68,102.141 r90 bottom
R25 "4.87kR" "RES 0402/1005 RF" 69.193,45.643 r180 top
R26 "4.87kR" "RES 0402/1005 RF" 69.012,56.524 r180 top
R27 "1.02kR" "RES 0402/1005 RF" 40.589,62.001 r270 top
R28 "1.02kR" "RES 0402/1005 RF" 35.916,60.02 r270 top
R29 "10kR" "RES 0402/1005 RF" 47.048,62.763 r90 top
R30 "10kR" "RES 0402/1005 RF" 45.322,63.017 r90 top
R31 "39.2R" "RES 0402/1005 RF" 186.039,255.482 r90 top
R32 "39.2R" "RES 0402/1005 RF" 186.039,259.546 r90 top
R33 "39.2R" "RES 0402/1005 RF" 175.244,244.502 r270 top
R34 "39.2R" "RES 0402/1005 RF" 177.303,240.565 r270 top
R35 "39.2R" "RES 0402/1005 RF" 184.985,255.482 r90 top
R36 "39.2R" "RES 0402/1005 RF" 187.055,259.546 r90 top
R37 "39.2R" "RES 0402/1005 RF" 176.26,244.502 r270 top
R38 "39.2R" "RES 0402/1005 RF" 189.087,259.546 r90 top
R39 "39.2R" "RES 0402/1005 RF" 187.055,255.482 r90 top
R40 "39.2R" "RES 0402/1005 RF" 189.087,255.482 r90 top
R41 "39.2R" "RES 0402/1005 RF" 176.26,240.565 r270 top
R42 "39.2R" "RES 0402/1005 RF" 184.007,255.482 r90 top
R43 "39.2R" "RES 0402/1005 RF" 185.023,259.546 r90 top
R44 "39.2R" "RES 0402/1005 RF" 190.103,255.482 r90 top
R45 "39.2R" "RES 0402/1005 RF" 175.244,240.565 r270 top
R46 "39.2R" "RES 0402/1005 RF" 179.308,244.502 r270 top
R47 "39.2R" "RES 0402/1005 RF" 184.134,259.546 r90 top
R48 "39.2R" "RES 0402/1005 RF" 174.228,244.502 r270 top
R49 "39.2R" "RES 0402/1005 RF" 188.071,255.482 r90 top
R50 "39.2R" "RES 0402/1005 RF" 183.245,259.546 r90 top
R51 "39.2R" "RES 0402/1005 RF" 177.303,244.502 r270 top
R52 "36R" "RES 0402/1005 RF" 179.435,240.565 r270 top
R53 "39.2R" "RES 0402/1005 RF" 174.228,240.565 r270 top
R54 "36R" "RES 0402/1005 RF" 180.324,244.502 r270 top
R55 "39.2R" "RES 0402/1005 RF" 188.071,259.546 r90 top
R56 "499R" "RES 0402/1005 RF" 176.641,234.977 r270 top
R57 "39.2R" "RES 0402/1005 RF" 178.292,244.502 r270 top
R58 "4.7kR" "RES 0402/1005 RF" 175.244,234.977 r270 top
R59 "39.2R" "RES 0402/1005 RF" 178.292,240.565 r270 top
R60 "1kR" "RES 0402/1005 RF" 184.007,263.356 r180 top
R61 "240R" "RES 0402/1005 RF" 202.147,264.901 r90 top
R62 "240R" "RES 0402/1005 RF" 201.697,252.201 r90 top
R63 "240R" "RES 0402/1005 RF" 202.216,240.263 r90 top
R64 "240R" "RES 0402/1005 RF" 210.579,240.899 r90 top
R65 "4.7kR" "RES 0402/1005 RF" 50.154,141.54 r180 top
R66 "4.7kR" "RES 0402/1005 RF" 50.154,142.621 r180 top
R67 "4.7kR" "RES 0402/1005 RF" 50.154,139.508 r180 top
R68 "4.7kR" "RES 0402/1005 RF" 50.154,140.524 r180 top
R69 "100R" "RES 0402/1005 RF" 45.847,197.485 r90 top
R70 "100R" "RES 0402/1005 RF" 51.689,197.485 r90 top
R71 "0R" "RES 0402/1005 RF" 46.863,146.05 r180 top
R72 "0R" "RES 0402/1005 RF" 46.863,145.034 r180 top
R73 "0R" "RES 0402/1005 RF" 49.025,146.05 r180 top
R74 "0R" "RES 0402/1005 RF" 49.025,145.034 r180 top
R75 "100R" "RES 0402/1005 RF" 93.998,140.075 r180 top
R76 "100R" "RES 0402/1005 RF" 93.548,128.342 r0 top
R77 "7.5kR" "RES 0402/1005 RF" 444.144,347.285 r90 top
R78 "100R" "RES 0402/1005 RF" 410.862,405.003 r270 top
R79 "100R" "RES 0402/1005 RF" 461.086,304.978 r0 top
R80 "100R" "RES 0402/1005 RF" 422.827,306.078 r0 top
R81 "100R" "RES 0402/1005 RF" 439.318,347.336 r180 top
R82 "100R" "RES 0402/1005 RF" 194.818,169.418 r90 top
R83 "4.7kR" "RES 0402/1005 RF" 108.077,219.701 r0 top
R84 "4.7kR" "RES 0402/1005 RF" 108.331,216.281 r0 top
R85 "4.7kR" "RES 0402/1005 RF" 108.077,218.821 r0 top
R86 "4.7kR" "RES 0402/1005 RF" 108.331,217.424 r0 top
R87 "30R" "RES 0402/1005 RF" 138.049,205.562 r180 bottom
R88 "30R" "RES 0402/1005 RF" 138.049,203.479 r180 bottom
R89 "30R" "RES 0402/1005 RF" 138.049,210.769 r180 bottom
R90 "30R" "RES 0402/1005 RF" 138.049,208.686 r180 bottom
R91 "0R" "RES 0402/1005 RF" 138.049,209.728 r180 bottom
R92 "0R" "RES 0402/1005 RF" 138.049,211.811 r180 bottom
R93 "0R" "RES 0402/1005 RF" 138.049,212.852 r180 bottom
R94 "0R" "RES 0402/1005 RF" 138.049,202.438 r180 bottom
R95 "30R" "RES 0402/1005 RF" 138.049,204.521 r180 bottom
R96 "30R" "RES 0402/1005 RF" 138.049,207.645 r180 bottom
R97 "4.7kR" "RES 0402/1005 RF" 138.049,206.604 r180 bottom
R98 "4.7kR" "RES 0402/1005 RF" 98.954,172.085 r180 bottom
R99 "4.7kR" "RES 0402/1005 RF" 360.883,61.417 r90 top
R100 "Resistance" "RES 0402/1005 RF" 320.421,311.404 r0 top
R101 "30R" "RES 0402/1005 RF" 133.096,197.739 r180 top
R102 "30R" "RES 0402/1005 RF" 133.096,195.707 r180 top
R103 "30R" "RES 0402/1005 RF" 133.096,193.675 r180 top
R104 "30R" "RES 0402/1005 RF" 133.096,191.643 r180 top
R105 "30R" "RES 0402/1005 RF" 133.096,196.723 r180 top
R106 "1kR" "RES 0402/1005 RF" 4.046,348.539 r180 top
R107 "30R" "RES 0402/1005 RF" 133.096,194.691 r180 top
R108 "30R" "RES 0402/1005 RF" 133.096,192.659 r180 top
R109 "1kR" "RES 0402/1005 RF" 142.494,330.581 r0 top
R110 "30R" "RES 0402/1005 RF" 133.096,198.755 r180 top
R111 "30R" "RES 0402/1005 RF" 133.096,190.602 r180 top
R112 "30R" "RES 0402/1005 RF" 133.096,189.611 r180 top
R113 "34.8kR" "RES 0402/1005 RF" 251.788,249.461 r270 top
R114 "10kR" "RES 0402/1005 RF" 252.738,249.468 r90 top
R115 "30R" "RES 0402/1005 RF" 94.953,204.77 r0 top
R116 "30R" "RES 0402/1005 RF" 93.403,197.866 r0 top
R117 "30R" "RES 0402/1005 RF" 91.313,197.866 r0 top
R118 "30R" "RES 0402/1005 RF" 86.995,197.866 r0 top
R119 "30R" "RES 0402/1005 RF" 94.953,205.883 r0 top
R120 "30R" "RES 0402/1005 RF" 93.853,199.644 r0 top
R121 "30R" "RES 0402/1005 RF" 89.535,199.644 r0 top